# Allegro board 980K2-260817_261120.brd

Outline 419.1 x 474.98 mm; copper layers: TOP, L02_GND, L03_DP, L04_GND, L05_DP, L06_GND, L07_VI, L08_GND, L09_VI, L10_GND, L11_VI, L12_GND, L13_VI, L14_GND, L15_5V, L16_5V, L17_C-BIT, L18_C-BIT, L19_GND, L20_VI, L21_GND, L22_VI, L23_GND, L24_VI, L25_GND, L26_VI, L27_GND, L28_DP, L29_GND, L30_DP, L31_GND, BOTTOM. Coordinates in mm from the lower left corner of the outline.

## Placement (name value [footprint] x y rotation side)
BC9  0.1U-50-X-S4-TDK  [C0402]  86.11 107.82 180 bottom
BR5  1K-1-S4  [R0402]  86.11 106.3 0 bottom
BR6  1K-1-S4  [R0402]  86.11 103.5 0 bottom
BR7  0-5-S6  [R0603]  83.44 106.3 180 bottom
BR8  0-5-S4  [R0402]  86.11 105.03 180 bottom
BR9  0-5-S4  [R0402]  86.11 102.24 180 bottom
BU1  AT24C512C-SSHM-T-SOIC8  [SO8_206X127MM]  91.06 105.66 180 bottom
C48  0.01U-100-X7R-S6-MU  [C0603]  147.57 273.87 90 bottom
C49  0.01U-100-X7R-S6-MU  [C0603]  136.27 268.99 270 bottom
C50  0.01U-100-X7R-S6-MU  [C0603]  142.28 268.54 270 bottom
C53  1U-16-X5R-S4-YA  [C0402]  142.24 261.62 270 bottom
C54  2.2U-16-X-S4-MU  [C0402]  136.53 261.62 270 bottom
C58  1U-16-X5R-S4-YA  [C0402]  142.11 257.68 270 bottom
C59  4.7U-100-X-SB-MU  [C1210]  140.59 246.51 270 bottom
C60  0.01U-100-X7R-S6-MU  [C0603]  147.01 259.72 0 bottom
C61  0.01U-100-X7R-S6-MU  [C0603]  156.88 264.78 180 bottom
C62  2.2U-16-X-S4-MU  [C0402]  157.07 259.72 0 bottom
C63  0.01U-100-X7R-S6-MU  [C0603]  157.73 261.82 90 bottom
C64  0.01U-100-X7R-S6-MU  [C0603]  156.88 267.82 180 bottom
C65  0.1U-25-X7R-S4-MU  [C0402]  157.73 271.37 90 bottom
C66  0.1U-25-X7R-S4-MU  [C0402]  152.65 276.61 180 bottom
C67  0.1U-25-X7R-S4-MU  [C0402]  150.24 278.13 180 bottom
C68  0.1U-25-X7R-S4-MU  [C0402]  147.83 282.7 180 bottom
C69  0.01U-100-X7R-S6-MU  [C0603]  151.96 259.72 0 bottom
C70  0.1U-25-X7R-S4-MU  [C0402]  122.8 294.89 180 bottom
C71  0.1U-25-X7R-S4-MU  [C0402]  129.42 294.89 180 bottom
C72  0.1U-25-X7R-S4-MU  [C0402]  158.75 227.33 0 bottom
C73  0.1U-25-X7R-S4-MU  [C0402]  153.67 227.33 0 bottom
C74  0.1U-25-X7R-S4-MU  [C0402]  157.73 273.91 90 bottom
CT1  47U-16-X5R-SB-MU  [C1210]  88.14 153.16 180 bottom
CT2  10U-16-X5R-S8-TY  [C0805]  108.2 164.59 90 bottom
CT3  22U-16-X-S8-MU  [C0805]  110.49 164.59 90 bottom
CT7  47U-16-X5R-SB-MU  [C1210]  88.14 132.84 180 bottom
CT8  10U-16-X5R-S8-TY  [C0805]  110.49 144.27 90 bottom
CT9  22U-16-X-S8-MU  [C0805]  108.2 144.27 90 bottom
F1  C1F8-0.25A-SA  [FUSE_1206_H1P05MM]  88.14 156.72 0 bottom
F2  C1F8-0.25A-SA  [FUSE_1206_H1P05MM]  88.14 136.4 0 bottom
FD1  -  [FD_040_V2]  95.25 123.19 0 top
FD2  -  [FD_040_V2]  323.85 123.19 0 top
FD3  -  [FD_040_V2]  323.85 351.79 0 top
FD4  -  [FD_040_V2]  95.25 351.79 0 top
FD5  -  [FD_040_V2]  323.85 123.19 180 bottom
FD6  -  [FD_040_V2]  95.25 123.19 180 bottom
FD7  -  [FD_040_V2]  95.25 351.79 180 bottom
FD8  -  [FD_040_V2]  323.85 351.79 180 bottom
FD9  -  [FD_040_V2]  19.05 123.19 0 top
FD10  -  [FD_040_V2]  400.05 123.19 0 top
FD11  -  [FD_040_V2]  400.05 351.79 0 top
FD12  -  [FD_040_V2]  19.05 351.79 0 top
FD13  -  [FD_040_V2]  400.05 123.19 180 bottom
FD14  -  [FD_040_V2]  19.05 123.19 180 bottom
FD15  -  [FD_040_V2]  19.05 351.79 180 bottom
FD16  -  [FD_040_V2]  400.05 351.79 180 bottom
K1  UA2-5NJ-A-V3  [RL_NECUA2_5V_V3]  138.43 290.63 270 bottom
K2  G3VM-201DR  [RL_G3VM201DR_200V]  144.15 277.5 0 bottom
K3  G3VM-201DR  [RL_G3VM201DR_200V]  134.49 273.18 90 bottom
K4  G3VM-201DR  [RL_G3VM201DR_200V]  144.15 291.47 0 bottom
K5  G3VM-51UR-5V-VSON4  [RL_G3VM_4P_VSON4]  139.95 268.99 0 bottom
K6  G3VM-51UR-5V-VSON4  [RL_G3VM_4P_VSON4]  139.95 266.19 0 bottom
K7  G3VM-51UR-5V-VSON4  [RL_G3VM_4P_VSON4]  139.95 264.16 0 bottom
K8  G3VM-51UR-5V-VSON4  [RL_G3VM_4P_VSON4]  139.95 261.62 0 bottom
K9  G3VM-51UR-5V-VSON4  [RL_G3VM_4P_VSON4]  134.24 261.62 0 bottom
K10  G3VM-51UR-5V-VSON4  [RL_G3VM_4P_VSON4]  135.38 264.16 0 bottom
K11  G3VM-51UR-5V-VSON4  [RL_G3VM_4P_VSON4]  143.76 257.3 90 bottom
K12  G3VM-51UR-5V-VSON4  [RL_G3VM_4P_VSON4]  143.76 252.48 90 bottom
K13  G3VM-51UR-5V-VSON4  [RL_G3VM_4P_VSON4]  143.76 246.51 90 bottom
K14  G3VM-51UR-5V-VSON4  [RL_G3VM_4P_VSON4]  146.56 252.48 90 bottom
K15  UA2-5NJ-A-V3  [RL_NECUA2_5V_V3]  135.25 242.75 270 bottom
K16  G3VM-51UR-5V-VSON4  [RL_G3VM_4P_VSON4]  146.56 257.3 90 bottom
K17  G3VM-51UR-5V-VSON4  [RL_G3VM_4P_VSON4]  148.72 257.3 90 bottom
K18  G3VM-51UR-5V-VSON4  [RL_G3VM_4P_VSON4]  148.72 252.48 90 bottom
K19  G3VM-51UR-5V-VSON4  [RL_G3VM_4P_VSON4]  151.51 257.3 90 bottom
K20  G3VM-51UR-5V-VSON4  [RL_G3VM_4P_VSON4]  151.51 252.48 90 bottom
K21  G3VM-51UR-5V-VSON4  [RL_G3VM_4P_VSON4]  153.67 257.3 90 bottom
K22  G3VM-51UR-5V-VSON4  [RL_G3VM_4P_VSON4]  153.67 252.48 90 bottom
K23  UA2-5NJ-A-V3  [RL_NECUA2_5V_V3]  152.78 242.75 270 bottom
K24  UA2-5NJ-A-V3  [RL_NECUA2_5V_V3]  161.04 242.75 270 bottom
K25  G3VM-51UR-5V-VSON4  [RL_G3VM_4P_VSON4]  156.97 257.3 90 bottom
K26  G3VM-51UR-5V-VSON4  [RL_G3VM_4P_VSON4]  156.97 252.48 90 bottom
K27  G3VM-51UR-5V-VSON4  [RL_G3VM_4P_VSON4]  160.15 261.37 180 bottom
K28  G3VM-51UR-5V-VSON4  [RL_G3VM_4P_VSON4]  164.72 261.37 180 bottom
K29  G3VM-51UR-5V-VSON4  [RL_G3VM_4P_VSON4]  169.29 261.37 180 bottom
K30  G3VM-51UR-5V-VSON4  [RL_G3VM_4P_VSON4]  160.15 265.18 180 bottom
K31  G3VM-51UR-5V-VSON4  [RL_G3VM_4P_VSON4]  164.72 265.18 180 bottom
K32  G3VM-51UR-5V-VSON4  [RL_G3VM_4P_VSON4]  169.29 265.18 180 bottom
K33  G3VM-51UR-5V-VSON4  [RL_G3VM_4P_VSON4]  160.15 268.22 180 bottom
K34  G3VM-51UR-5V-VSON4  [RL_G3VM_4P_VSON4]  164.72 268.22 180 bottom
K35  G3VM-51UR-5V-VSON4  [RL_G3VM_4P_VSON4]  169.29 268.22 180 bottom
K36  G3VM-51UR-5V-VSON4  [RL_G3VM_4P_VSON4]  160.15 271.27 180 bottom
K37  G3VM-51UR-5V-VSON4  [RL_G3VM_4P_VSON4]  164.72 271.27 180 bottom
K38  G3VM-51UR-5V-VSON4  [RL_G3VM_4P_VSON4]  160.15 273.81 180 bottom
K39  G3VM-51UR-5V-VSON4  [RL_G3VM_4P_VSON4]  164.72 273.81 180 bottom
K40  G3VM-51UR-5V-VSON4  [RL_G3VM_4P_VSON4]  155.58 273.05 270 bottom
K41  G3VM-51UR-5V-VSON4  [RL_G3VM_4P_VSON4]  155.58 277.62 270 bottom
K42  G3VM-51UR-5V-VSON4  [RL_G3VM_4P_VSON4]  155.58 282.19 270 bottom
K43  G3VM-51UR-5V-VSON4  [RL_G3VM_4P_VSON4]  152.65 273.05 270 bottom
K44  G3VM-51UR-5V-VSON4  [RL_G3VM_4P_VSON4]  152.65 278.89 270 bottom
K45  G3VM-51UR-5V-VSON4  [RL_G3VM_4P_VSON4]  152.65 283.46 270 bottom
K46  G3VM-51UR-5V-VSON4  [RL_G3VM_4P_VSON4]  150.24 274.57 270 bottom
K47  G3VM-51UR-5V-VSON4  [RL_G3VM_4P_VSON4]  150.24 280.42 270 bottom
K48  G3VM-51UR-5V-VSON4  [RL_G3VM_4P_VSON4]  150.24 284.99 270 bottom
K49  G3VM-51UR-5V-VSON4  [RL_G3VM_4P_VSON4]  147.83 284.99 270 bottom
K50  G3VM-51UR-5V-VSON4  [RL_G3VM_4P_VSON4]  147.83 279.15 270 bottom
K51  G3VM-51UR-5V-VSON4  [RL_G3VM_4P_VSON4]  148.72 246.51 270 bottom
K52  G3VM-51UR-5V-VSON4  [RL_G3VM_4P_VSON4]  148.72 241.17 90 bottom
K53  G3VM-51UR-5V-VSON4  [RL_G3VM_4P_VSON4]  156.97 246.51 270 bottom
K54  G3VM-51UR-5V-VSON4  [RL_G3VM_4P_VSON4]  156.97 241.17 90 bottom
K55  G3VM-51UR-5V-VSON4  [RL_G3VM_4P_VSON4]  123.44 292.35 0 bottom
K56  G3VM-201DR  [RL_G3VM201DR_200V]  128.4 288.67 90 bottom
K57  G3VM-51UR-5V-VSON4  [RL_G3VM_4P_VSON4]  158.12 234.57 270 bottom
K58  G3VM-51UR-5V-VSON4  [RL_G3VM_4P_VSON4]  156.08 234.57 270 bottom
K59  G3VM-51UR-5V-VSON4  [RL_G3VM_4P_VSON4]  153.04 234.57 270 bottom
K60  G3VM-51UR-5V-VSON4  [RL_G3VM_4P_VSON4]  151 234.57 270 bottom
K61  G3VM-51UR-5V-VSON4  [RL_G3VM_4P_VSON4]  130.05 292.35 0 bottom
LD1  LDG-2-S6  [LED_0603]  88.91 165.19 0 top
LD3  LDG-2-S6  [LED_0603]  88.91 144.87 0 top
LT1  L10U-16A-S16.5X15.5-PU  [IND_16P5X15P5MM]  98.93 156.59 0 bottom
LT3  L10U-16A-S16.5X15.5-PU  [IND_16P5X15P5MM]  98.93 136.27 0 bottom
M1  PG_LTXDX_F_X1_OUTLINE_TD_V2  [PG_LTXDX_F_X1_OUTLINE_TD_COHU]  209.55 237.49 0 top
NOREF  -  []  273.76 250.88 90 top
NOREF#2  -  []  223.89 185.24 90 top
NOREF#3  -  []  214.43 292.23 0 top
NOREF#4  -  []  93.68 136.27 0 top
NOREF#5  -  []  279.4 262.09 0 top
NOREF#6  -  []  178.83 232.23 0 top
NOREF#7  -  []  232.72 257.6 0 top
NOREF#8  -  []  199.06 238.07 0 top
NOREF#9  -  []  170.89 206.13 0 top
NOREF#10  -  []  148.78 228.49 0 top
NOREF#11  -  []  179.72 213.6 90 top
NOREF#12  -  []  138.56 246.51 0 top
NOREF#13  -  []  149.78 228.3 0 top
NOREF#14  -  []  271.24 193.03 90 top
NOREF#15  -  []  196.52 216.55 0 top
NOREF#16  -  []  187.03 231.4 0 top
NOREF#17  -  []  163.97 214.54 0 top
NOREF#18  -  []  187.8 209.99 0 top
NOREF#19  -  []  175.02 268.14 90 top
NOREF#20  -  []  195.17 272.17 90 top
NOREF#21  -  []  156.02 248.11 90 top
NOREF#22  -  []  231.24 253.03 90 top
NOREF#23  -  []  284.64 181.15 90 top
NOREF#24  -  []  236.79 171.3 0 top
NOREF#25  -  []  133.45 184.35 0 top
NOREF#26  -  []  270.97 190.88 90 top
NOREF#27  -  []  202.85 237.22 0 top
NOREF#28  -  []  163.84 261.77 0 top
NOREF#29  -  []  83.04 144.22 90 top
NOREF#30  -  []  243.84 204.78 90 top
NOREF#31  -  []  279.22 250.88 90 top
NOREF#32  -  []  233.98 238.07 0 top
NOREF#33  -  []  279.27 261.77 0 top
NOREF#34  -  []  273.39 197.85 90 top
NOREF#35  -  []  131.22 234.24 90 top
NOREF#36  -  []  234.33 204.33 90 top
NOREF#37  -  []  94.87 108.59 0 top
NOREF#38  -  []  150.88 228.6 90 top
NOREF#39  -  []  189.72 215.77 0 top
NOREF#40  -  []  244.76 392.33 90 top
NOREF#41  -  []  276.52 276.55 0 top
NOREF#42  -  []  201.75 266.13 0 top
NOREF#43  -  []  184.16 191.6 90 top
NOREF#44  -  []  158.64 173.37 90 top
NOREF#45  -  []  243.84 211.67 0 top
NOREF#46  -  []  189.72 275.77 0 top
NOREF#47  -  []  226.01 184.91 90 top
NOREF#48  -  []  152.25 272.17 0 top
NOREF#49  -  []  134.43 292.23 0 top
NOREF#50  -  []  300.14 320.9 0 top
NOREF#51  -  []  293.02 392.33 90 top
NOREF#52  -  []  259.08 261.22 0 top
NOREF#53  -  []  164.95 272.86 90 top
NOREF#54  -  []  138.95 201.55 0 top
NOREF#55  -  []  276.84 227.33 0 top
NOREF#56  -  []  146.01 190.88 90 top
NOREF#57  -  []  262.81 192.78 0 top
NOREF#58  -  []  190.6 173.69 0 top
NOREF#59  -  []  271.18 239.15 0 top
NOREF#60  -  []  193.6 286.96 0 top
NOREF#61  -  []  243.84 201.77 0 top
NOREF#62  -  []  210.89 202.32 0 top
NOREF#63  -  []  187.3 226.19 0 top
NOREF#64  -  []  162.44 232.28 0 top
NOREF#65  -  []  239.22 255.7 90 top
NOREF#66  -  []  162.2 178.35 0 top
NOREF#67  -  []  199.06 178.07 0 top
NOREF#68  -  []  239.27 213.41 90 top
NOREF#69  -  []  182.87 286.99 0 top
NOREF#70  -  []  129.17 231.95 0 top
NOREF#71  -  []  239.27 265.58 0 top
NOREF#72  -  []  260.43 284.38 90 top
NOREF#73  -  []  198.11 172.1 0 top
NOREF#74  -  []  275.17 272.17 90 top
NOREF#75  -  []  264.16 196.43 90 top
NOREF#76  -  []  156.7 241.72 90 top
NOREF#77  -  []  274.39 276.17 90 top
NOREF#78  -  []  271.11 200.17 90 top
NOREF#79  -  []  236.52 216.55 0 top
NOREF#80  -  []  235.17 276.75 90 top
NOREF#81  -  []  288.54 205.9 0 top
NOREF#82  -  []  192.13 284.66 0 top
NOREF#83  -  []  146.88 289.79 0 top
NOREF#84  -  []  154.63 279.22 90 top
NOREF#85  -  []  227.3 280.35 0 top
NOREF#86  -  []  187.45 209.24 0 top
NOREF#87  -  []  271.18 179.15 0 top
NOREF#88  -  []  159.22 195.7 90 top
NOREF#89  -  []  239.72 223.79 90 top
NOREF#90  -  []  131.05 185.49 90 top
NOREF#91  -  []  279.4 274.54 0 top
NOREF#92  -  []  250.92 231.95 90 top
NOREF#93  -  []  283.84 268.62 0 top
NOREF#94  -  []  279.27 268.62 0 top
NOREF#95  -  []  142.81 197.6 0 top
NOREF#96  -  []  140.59 244.98 90 top
NOREF#97  -  []  260.83 261.22 90 top
NOREF#98  -  []  219.08 261.22 0 top
NOREF#99  -  []  281.75 266.13 0 top
NOREF#100  -  []  156.57 185.63 0 top
NOREF#101  -  []  267.43 218.27 90 top
NOREF#102  -  []  232.13 280.09 0 top
NOREF#103  -  []  228.99 180.62 0 top
NOREF#104  -  []  245.38 226.23 0 top
NOREF#105  -  []  236.1 271.85 90 top
NOREF#106  -  []  199.4 205.9 0 top
NOREF#107  -  []  135.43 276.18 0 top
NOREF#108  -  []  239.72 219.22 90 top
NOREF#109  -  []  159.4 204.45 90 top
NOREF#110  -  []  237.92 250.01 0 top
NOREF#111  -  []  180.83 265.79 90 top
NOREF#112  -  []  132.26 248.4 0 top
NOREF#113  -  []  197.74 166.36 90 top
NOREF#114  -  []  228.32 182.05 0 top
NOREF#115  -  []  156.1 220.99 90 top
NOREF#116  -  []  275.92 190.88 90 top
NOREF#117  -  []  219.08 265.79 0 top
NOREF#118  -  []  184.04 191.93 0 top
NOREF#119  -  []  148.24 392.33 90 top
NOREF#120  -  []  255.11 201.22 90 top
NOREF#121  -  []  212.55 284.49 0 top
NOREF#122  -  []  216.55 254.49 90 top
NOREF#123  -  []  176.26 263.76 90 top
NOREF#124  -  []  279.27 271.67 0 top
NOREF#125  -  []  266.83 256.75 0 top
NOREF#126  -  []  150.77 219.22 90 top
NOREF#127  -  []  243.92 229.94 0 top
NOREF#128  -  []  235.15 176.17 90 top
NOREF#129  -  []  213.36 201.22 0 top
NOREF#130  -  []  288.39 456.29 0 top
NOREF#131  -  []  276.1 276.42 90 top
NOREF#132  -  []  199.27 211.67 0 top
NOREF#133  -  []  279.22 190.88 90 top
NOREF#134  -  []  270.6 173.69 0 top
NOREF#135  -  []  197.71 232.86 0 top
NOREF#136  -  []  185.42 274.72 90 top
NOREF#137  -  []  237.04 244.35 0 top
NOREF#138  -  []  244.95 264.23 90 top
NOREF#139  -  []  199.72 274.65 90 top
NOREF#140  -  []  229.84 273.7 90 top
NOREF#141  -  []  155.58 202.67 90 top
NOREF#142  -  []  161.41 227.9 90 top
NOREF#143  -  []  146.16 258.18 0 top
NOREF#144  -  []  199.27 208.62 0 top
NOREF#145  -  []  234.07 251.6 90 top
NOREF#146  -  []  190.97 195.7 90 top
NOREF#147  -  []  268.78 228.49 0 top
NOREF#148  -  []  152.25 282.59 90 top
NOREF#149  -  []  226.28 257.85 90 top
NOREF#150  -  []  175.65 184.35 0 top
NOREF#151  -  []  131.22 294.24 90 top
NOREF#152  -  []  268.44 253.03 90 top
NOREF#153  -  []  231.11 258.18 0 top
NOREF#154  -  []  168.54 260.64 90 top
NOREF#155  -  []  192.25 212.18 90 top
NOREF#156  -  []  272.13 280.09 0 top
NOREF#157  -  []  191.11 253.35 0 top
NOREF#158  -  []  266.69 297.01 90 top
NOREF#159  -  []  204.64 241.15 90 top
NOREF#160  -  []  158.04 228.3 0 top
NOREF#161  -  []  318.12 17.15 90 top
NOREF#162  -  []  236.54 167 0 top
NOREF#163  -  []  196.8 220.49 90 top
NOREF#164  -  []  227.43 284.11 0 top
NOREF#165  -  []  220.83 268.59 90 top
NOREF#166  -  []  167.95 226.12 90 top
NOREF#167  -  []  151.79 196.75 0 top
NOREF#168  -  []  196.57 245.63 90 top
NOREF#169  -  []  164.64 181.15 90 top
NOREF#170  -  []  193.39 193.03 90 top
NOREF#171  -  []  156.52 216.55 0 top
NOREF#172  -  []  174.07 210.89 90 top
NOREF#173  -  []  204.95 207.27 90 top
NOREF#174  -  []  283.97 265.9 0 top
NOREF#175  -  []  224.04 185.96 0 top
NOREF#176  -  []  140.43 224.38 90 top
NOREF#177  -  []  260.43 224.38 90 top
NOREF#178  -  []  186.7 237.02 90 top
NOREF#179  -  []  269.12 256.43 90 top
NOREF#180  -  []  226.96 191.6 90 top
NOREF#181  -  []  279.27 207.82 90 top
NOREF#182  -  []  192.25 218.02 90 top
NOREF#183  -  []  181.55 262.57 90 top
NOREF#184  -  []  273.27 198.18 0 top
NOREF#185  -  []  189.84 224.11 90 top
NOREF#186  -  []  268.32 193.35 0 top
NOREF#187  -  []  212.87 287.4 90 top
NOREF#188  -  []  271.19 283.92 0 top
NOREF#189  -  []  189.12 256.43 90 top
NOREF#190  -  []  227.05 269.24 0 top
NOREF#191  -  []  191.53 173.37 90 top
NOREF#192  -  []  187.3 286.19 0 top
NOREF#193  -  []  239.27 271.67 0 top
NOREF#194  -  []  284.95 260.42 90 top
NOREF#195  -  []  186.7 283.04 90 top
NOREF#196  -  []  241.12 248.11 90 top
NOREF#197  -  []  183.89 245.24 90 top
NOREF#198  -  []  258.95 204.09 0 top
NOREF#199  -  []  239.44 239.15 0 top
NOREF#200  -  []  297.39 456.29 0 top
NOREF#201  -  []  153.03 232.1 0 top
NOREF#202  -  []  194.33 264.33 90 top
NOREF#203  -  []  266.83 196.75 0 top
NOREF#204  -  []  249.52 210.32 90 top
NOREF#205  -  []  148.32 245.63 0 top
NOREF#206  -  []  151.18 179.15 0 top
NOREF#207  -  []  189.72 281.62 0 top
NOREF#208  -  []  287.25 19.69 90 top
NOREF#209  -  []  289.52 272.86 90 top
NOREF#210  -  []  251.05 185.49 90 top
NOREF#211  -  []  228.32 198.18 0 top
NOREF#212  -  []  236.57 245.63 0 top
NOREF#213  -  []  264.04 185.96 0 top
NOREF#214  -  []  178.97 18.69 0 top
NOREF#215  -  []  152.13 220.09 0 top
NOREF#216  -  []  212.55 250.49 90 top
NOREF#217  -  []  271.91 251.6 90 top
NOREF#218  -  []  193.6 282.39 0 top
NOREF#219  -  []  196.33 167.9 90 top
NOREF#220  -  []  143.89 185.24 90 top
NOREF#221  -  []  181.6 248.12 0 top
NOREF#222  -  []  155.05 274.25 0 top
NOREF#223  -  []  277.71 233.69 90 top
NOREF#224  -  []  158.11 172.1 0 top
NOREF#225  -  []  275.49 18.69 90 top
NOREF#226  -  []  279.4 208.95 0 top
NOREF#227  -  []  156.81 232.54 0 top
NOREF#228  -  []  220.95 261.55 90 top
NOREF#229  -  []  294.09 207.27 90 top
NOREF#230  -  []  138.83 292.23 0 top
NOREF#231  -  []  179.08 205.79 0 top
NOREF#232  -  []  226.16 212.17 90 top
NOREF#233  -  []  211.05 245.49 90 top
NOREF#234  -  []  269.24 185.31 90 top
NOREF#235  -  []  193.95 256.75 0 top
NOREF#236  -  []  171.05 185.49 90 top
NOREF#237  -  []  255.84 202.57 90 top
NOREF#238  -  []  270.97 179.57 90 top
NOREF#239  -  []  276.7 197.85 90 top
NOREF#240  -  []  189.84 273.7 0 top
NOREF#241  -  []  232.63 172.86 0 top
NOREF#242  -  []  248.54 205.9 0 top
NOREF#243  -  []  125.25 291.4 0 top
NOREF#244  -  []  159.24 184.35 0 top
NOREF#245  -  []  192.63 233.69 0 top
NOREF#246  -  []  207.95 286.12 90 top
NOREF#247  -  []  277.74 166.36 90 top
NOREF#248  -  []  138.95 206.12 0 top
NOREF#249  -  []  231.11 253.35 0 top
NOREF#250  -  []  193.27 258.18 0 top
NOREF#251  -  []  144.04 185.96 0 top
NOREF#252  -  []  177.29 247.78 0 top
NOREF#253  -  []  239.4 213.09 90 top
NOREF#254  -  []  193.76 190.88 90 top
NOREF#255  -  []  95.35 396.29 0 top
NOREF#256  -  []  131.84 21.69 90 top
NOREF#257  -  []  232.25 222.59 0 top
NOREF#258  -  []  189.84 284.11 90 top
NOREF#259  -  []  239.72 214.65 90 top
NOREF#260  -  []  161.44 184.35 0 top
NOREF#261  -  []  196.52 221.12 0 top
NOREF#262  -  []  166.32 269.17 0 top
NOREF#263  -  []  152.11 231.4 0 top
NOREF#264  -  []  243.84 260.97 90 top
NOREF#265  -  []  239.4 262.09 0 top
NOREF#266  -  []  179.72 273.6 90 top
NOREF#267  -  []  109.54 14.59 90 top
NOREF#268  -  []  151.7 277.85 0 top
NOREF#269  -  []  195.17 216.75 0 top
NOREF#270  -  []  196.52 285.69 0 top
NOREF#271  -  []  129.17 291.95 0 top
NOREF#272  -  []  246.32 206.13 0 top
NOREF#273  -  []  136.5 271.94 90 top
NOREF#274  -  []  243.84 271.67 0 top
NOREF#275  -  []  196.57 182.05 0 top
NOREF#276  -  []  270.56 197.6 0 top
NOREF#277  -  []  192.63 233.69 90 top
NOREF#278  -  []  260.95 266.12 90 top
NOREF#279  -  []  283.84 205.58 0 top
NOREF#280  -  []  156.38 241.15 90 top
NOREF#281  -  []  249.52 272.86 90 top
NOREF#282  -  []  230.77 213.37 90 top
NOREF#283  -  []  214.04 210.63 90 top
NOREF#284  -  []  277.25 256.75 0 top
NOREF#285  -  []  130.02 274.45 0 top
NOREF#286  -  []  211.25 244.35 0 top
NOREF#287  -  []  197.92 190.01 0 top
NOREF#288  -  []  159.27 268.62 0 top
NOREF#289  -  []  226.96 251.6 90 top
NOREF#290  -  []  180.59 184.98 90 top
NOREF#291  -  []  275.17 216.75 0 top
NOREF#292  -  []  281.75 209.17 0 top
NOREF#293  -  []  271.73 172.54 0 top
NOREF#294  -  []  193.6 216.55 0 top
NOREF#295  -  []  266.01 190.88 90 top
NOREF#296  -  []  237.59 175.77 0 top
NOREF#297  -  []  197.04 244.35 0 top
NOREF#298  -  []  250.89 266.13 0 top
NOREF#299  -  []  172.87 227.4 90 top
NOREF#300  -  []  190.77 223.79 90 top
NOREF#301  -  []  288.54 260.64 90 top
NOREF#302  -  []  164.95 204.23 90 top
NOREF#303  -  []  266.96 196.43 90 top
NOREF#304  -  []  128.94 221.73 0 top
NOREF#305  -  []  324.88 21.69 90 top
NOREF#306  -  []  235.96 228.6 90 top
NOREF#307  -  []  236.38 241.15 90 top
NOREF#308  -  []  153.39 193.03 90 top
NOREF#309  -  []  228.32 258.18 0 top
NOREF#310  -  []  207.98 226.38 90 top
NOREF#311  -  []  268.32 253.35 0 top
NOREF#312  -  []  248.42 200.97 90 top
NOREF#313  -  []  154.63 282.42 0 top
NOREF#314  -  []  245.04 293.3 90 top
NOREF#315  -  []  283.97 260.64 90 top
NOREF#316  -  []  152.46 247.68 90 top
NOREF#317  -  []  153.95 191.93 0 top
NOREF#318  -  []  197.92 250.01 0 top
NOREF#319  -  []  227.77 257.6 0 top
NOREF#320  -  []  210.89 209.17 0 top
NOREF#321  -  []  157.59 235.77 0 top
NOREF#322  -  []  131.22 294.89 90 top
NOREF#323  -  []  151.71 231.3 0 top
NOREF#324  -  []  268.19 187.71 0 top
NOREF#325  -  []  281.75 274.76 0 top
NOREF#326  -  []  239.72 274.65 90 top
NOREF#327  -  []  199.4 200.64 90 top
NOREF#328  -  []  273.94 191.93 0 top
NOREF#329  -  []  163.97 213.09 90 top
NOREF#330  -  []  130.58 263.21 0 top
NOREF#331  -  []  168.54 267.5 90 top
NOREF#332  -  []  258.95 268.91 0 top
NOREF#333  -  []  133.68 389.27 90 top
NOREF#334  -  []  237.25 251.93 0 top
NOREF#335  -  []  276.81 232.54 0 top
NOREF#336  -  []  241.84 295.2 0 top
NOREF#337  -  []  248.54 268.95 0 top
NOREF#338  -  []  230.77 279.22 90 top
NOREF#339  -  []  151.24 257.85 90 top
NOREF#340  -  []  168.42 208.62 0 top
NOREF#341  -  []  187.8 269.99 0 top
NOREF#342  -  []  238.64 233.37 90 top
NOREF#343  -  []  159.22 179.57 90 top
NOREF#344  -  []  309.55 14.59 90 top
NOREF#345  -  []  269.84 273.7 90 top
NOREF#346  -  []  174.38 204.09 0 top
NOREF#347  -  []  146.7 223.05 90 top
NOREF#348  -  []  244.32 231.95 90 top
NOREF#349  -  []  195.68 233.69 90 top
NOREF#350  -  []  163.97 265.9 0 top
NOREF#351  -  []  275.17 216.75 90 top
NOREF#352  -  []  275.58 262.67 90 top
NOREF#353  -  []  187.03 171.4 0 top
NOREF#354  -  []  196.02 241.47 0 top
NOREF#355  -  []  208.54 260.64 90 top
NOREF#356  -  []  163.84 200.97 90 top
NOREF#357  -  []  124.61 234.89 90 top
NOREF#358  -  []  231.95 178.07 0 top
NOREF#359  -  []  188.81 195.7 90 top
NOREF#360  -  []  220.83 201.22 90 top
NOREF#361  -  []  155.15 176.17 90 top
NOREF#362  -  []  155.78 237.5 90 top
NOREF#363  -  []  156.54 167 0 top
NOREF#364  -  []  157.37 191.6 90 top
NOREF#365  -  []  278.64 173.37 90 top
NOREF#366  -  []  185.41 213.02 90 top
NOREF#367  -  []  248.42 264.78 90 top
NOREF#368  -  []  197.25 191.93 0 top
NOREF#369  -  []  199.22 190.88 90 top
NOREF#370  -  []  271.19 223.92 0 top
NOREF#371  -  []  271.46 227 0 top
NOREF#372  -  []  258.35 207.01 0 top
NOREF#373  -  []  153.18 282.26 90 top
NOREF#374  -  []  254.07 210.89 90 top
NOREF#375  -  []  91.03 148.19 0 top
NOREF#376  -  []  211.14 458.49 0 top
NOREF#377  -  []  192.72 257.6 0 top
NOREF#378  -  []  237.25 180.62 0 top
NOREF#379  -  []  217.29 187.78 0 top
NOREF#380  -  []  226.16 260.17 90 top
NOREF#381  -  []  262.81 197.6 0 top
NOREF#382  -  []  168.54 262.09 0 top
NOREF#383  -  []  179.08 261.22 0 top
NOREF#384  -  []  236.8 220.49 90 top
NOREF#385  -  []  154.07 191.6 90 top
NOREF#386  -  []  262.87 273.02 0 top
NOREF#387  -  []  245.38 226.23 0 top
NOREF#388  -  []  229.12 196.43 90 top
NOREF#389  -  []  220.83 203.76 90 top
NOREF#390  -  []  150.77 283.79 90 top
NOREF#391  -  []  148.95 206.89 0 top
NOREF#392  -  []  159.65 212.56 0 top
NOREF#393  -  []  189.84 219.54 90 top
NOREF#394  -  []  248.94 281.73 0 top
NOREF#395  -  []  253.65 179.15 0 top
NOREF#396  -  []  273.56 233.37 90 top
NOREF#397  -  []  234.07 256.43 90 top
NOREF#398  -  []  196.02 192.78 0 top
NOREF#399  -  []  266.01 195.7 90 top
NOREF#400  -  []  229.12 191.6 90 top
NOREF#401  -  []  187.77 252.78 0 top
NOREF#402  -  []  211.05 185.49 90 top
NOREF#403  -  []  86.61 153.16 0 top
NOREF#404  -  []  192.72 192.78 0 top
NOREF#405  -  []  191.24 197.85 90 top
NOREF#406  -  []  193.18 244.35 0 top
NOREF#407  -  []  250.89 209.17 0 top
NOREF#408  -  []  190.97 179.57 90 top
NOREF#409  -  []  199.4 264.45 90 top
NOREF#410  -  []  248.42 267.82 90 top
NOREF#411  -  []  163.4 296.38 0 top
NOREF#412  -  []  159.72 214.65 90 top
NOREF#413  -  []  181.85 246.47 0 top
NOREF#414  -  []  199.27 271.67 0 top
NOREF#415  -  []  209.52 267.27 90 top
NOREF#416  -  []  187.77 192.78 0 top
NOREF#417  -  []  243.97 210.55 90 top
NOREF#418  -  []  189.12 180.3 90 top
NOREF#419  -  []  193.95 191.93 0 top
NOREF#420  -  []  199.24 184.35 0 top
NOREF#421  -  []  242.44 292.28 0 top
NOREF#422  -  []  146.17 272.17 90 top
NOREF#423  -  []  169.17 231.95 0 top
NOREF#424  -  []  178.95 266.12 0 top
NOREF#425  -  []  202.26 176.17 90 top
NOREF#426  -  []  269.86 17.15 0 top
NOREF#427  -  []  276.7 181.72 90 top
NOREF#428  -  []  199.24 244.35 0 top
NOREF#429  -  []  153.98 238.07 0 top
NOREF#430  -  []  237.71 172.86 0 top
NOREF#431  -  []  206.32 209.17 0 top
NOREF#432  -  []  253.62 289.09 90 top
NOREF#433  -  []  203.84 211.67 0 top
NOREF#434  -  []  216.55 194.49 90 top
NOREF#435  -  []  147.43 218.27 90 top
NOREF#436  -  []  215.02 208.14 90 top
NOREF#437  -  []  187.8 265.39 90 top
NOREF#438  -  []  176.38 204.09 90 top
NOREF#439  -  []  155.05 278.82 0 top
NOREF#440  -  []  276.57 185.63 0 top
NOREF#441  -  []  187.99 178.35 0 top
NOREF#442  -  []  159.27 210.87 90 top
NOREF#443  -  []  159.22 190.88 90 top
NOREF#444  -  []  268.81 190.88 90 top
NOREF#445  -  []  148.32 185.63 0 top
NOREF#446  -  []  133.36 201.22 0 top
NOREF#447  -  []  162.85 297.22 0 top
NOREF#448  -  []  269.84 284.11 90 top
NOREF#449  -  []  80.49 155.57 0 top
NOREF#450  -  []  157.71 173.69 0 top
NOREF#451  -  []  234.39 276.17 90 top
NOREF#452  -  []  137.28 286.47 0 top
NOREF#453  -  []  155.68 233.69 90 top
NOREF#454  -  []  196.8 274.65 90 top
NOREF#455  -  []  187.43 278.27 0 top
NOREF#456  -  []  272.72 197.6 0 top
NOREF#457  -  []  275.56 235.77 0 top
NOREF#458  -  []  237.37 180.3 90 top
NOREF#459  -  []  248.42 260.97 90 top
NOREF#460  -  []  240.11 18.69 0 top
NOREF#461  -  []  276.8 214.65 90 top
NOREF#462  -  []  209.55 237.49 0 top
NOREF#463  -  []  156.8 225.06 90 top
NOREF#464  -  []  152.13 274.25 0 top
NOREF#465  -  []  154.63 277.85 0 top
NOREF#466  -  []  270.97 239.57 90 top
NOREF#467  -  []  279.27 265.58 0 top
NOREF#468  -  []  155.96 228.6 90 top
NOREF#469  -  []  273.27 193.35 0 top
NOREF#470  -  []  236.02 252.78 0 top
NOREF#471  -  []  174.43 292.23 0 top
NOREF#472  -  []  236.57 198.18 0 top
NOREF#473  -  []  266.43 296.46 90 top
NOREF#474  -  []  191.73 232.54 0 top
NOREF#475  -  []  263.36 247.38 0 top
NOREF#476  -  []  152.25 222.59 90 top
NOREF#477  -  []  188.35 283.79 90 top
NOREF#478  -  []  228.32 242.05 0 top
NOREF#479  -  []  89.74 155.92 0 top
NOREF#480  -  []  145.61 252.5 0 top
NOREF#481  -  []  246.32 214.76 0 top
NOREF#482  -  []  159.27 265.58 0 top
NOREF#483  -  []  133.78 207.01 0 top
NOREF#484  -  []  181.55 209.94 90 top
NOREF#485  -  []  150.97 179.57 90 top
NOREF#486  -  []  273.18 244.35 0 top
NOREF#487  -  []  187.77 257.6 0 top
NOREF#488  -  []  230.56 192.78 0 top
NOREF#489  -  []  265.61 252.78 0 top
NOREF#490  -  []  170.89 202.32 0 top
NOREF#491  -  []  283.97 212 0 top
NOREF#492  -  []  200.23 176.17 90 top
NOREF#493  -  []  196.79 231.3 0 top
NOREF#494  -  []  288.54 267.5 90 top
NOREF#495  -  []  183.36 198.18 0 top
NOREF#496  -  []  186.83 196.75 0 top
NOREF#497  -  []  148.32 258.18 0 top
NOREF#498  -  []  255.84 262.57 90 top
NOREF#499  -  []  283.97 268.95 0 top
NOREF#500  -  []  187.77 197.6 0 top
NOREF#501  -  []  157.37 251.6 90 top
NOREF#502  -  []  139.55 294.49 0 top
NOREF#503  -  []  211.21 234.89 90 top
NOREF#504  -  []  237.74 166.36 90 top
NOREF#505  -  []  279.4 204.45 90 top
NOREF#506  -  []  199.27 264.78 90 top
NOREF#507  -  []  239.4 200.64 90 top
NOREF#508  -  []  163.97 202.09 0 top
NOREF#509  -  []  141.85 246.47 0 top
NOREF#510  -  []  168.54 204.45 90 top
NOREF#511  -  []  286.32 206.13 0 top
NOREF#512  -  []  225.41 286.99 90 top
NOREF#513  -  []  157.81 389.27 90 top
NOREF#514  -  []  214.09 204.23 90 top
NOREF#515  -  []  232.25 282.59 0 top
NOREF#516  -  []  180.95 206.12 90 top
NOREF#517  -  []  199.4 274.54 0 top
NOREF#518  -  []  288.42 260.97 90 top
NOREF#519  -  []  199.4 273.09 90 top
NOREF#520  -  []  157.37 196.43 90 top
NOREF#521  -  []  189.84 213.7 90 top
NOREF#522  -  []  197.71 173.69 0 top
NOREF#523  -  []  186.16 193.35 0 top
NOREF#524  -  []  236.7 253.03 90 top
NOREF#525  -  []  151.98 226.59 90 top
NOREF#526  -  []  195.68 233.69 0 top
NOREF#527  -  []  188.81 190.88 90 top
NOREF#528  -  []  208.54 207.5 90 top
NOREF#529  -  []  251.05 229.49 0 top
NOREF#530  -  []  175.84 202.57 90 top
NOREF#531  -  []  186.96 251.6 90 top
NOREF#532  -  []  227.43 224.11 90 top
NOREF#533  -  []  223.36 193.35 0 top
NOREF#534  -  []  174.04 270.63 90 top
NOREF#535  -  []  281.75 212.22 0 top
NOREF#536  -  []  135.02 208.14 90 top
NOREF#537  -  []  241.75 214.76 0 top
NOREF#538  -  []  196.1 216.42 90 top
NOREF#539  -  []  235.17 281.32 0 top
NOREF#540  -  []  276.8 220.49 90 top
NOREF#541  -  []  149.29 279.37 0 top
NOREF#542  -  []  271.76 167.33 0 top
NOREF#543  -  []  223.89 245.24 90 top
NOREF#544  -  []  143.36 187.38 0 top
NOREF#545  -  []  193.76 195.7 90 top
NOREF#546  -  []  122.44 232.28 0 top
NOREF#547  -  []  266.16 253.35 0 top
NOREF#548  -  []  174.07 270.89 90 top
NOREF#549  -  []  129.44 260.67 0 top
NOREF#550  -  []  243.84 213.41 90 top
NOREF#551  -  []  232.13 274.25 0 top
NOREF#552  -  []  260.95 201.55 90 top
NOREF#553  -  []  152.63 173.69 90 top
NOREF#554  -  []  152.72 192.78 0 top
NOREF#555  -  []  227.77 252.78 0 top
NOREF#556  -  []  192.72 197.6 0 top
NOREF#557  -  []  272.72 252.78 0 top
NOREF#558  -  []  134.04 210.63 90 top
NOREF#559  -  []  213.65 239.15 0 top
NOREF#560  -  []  273.39 253.03 90 top
NOREF#561  -  []  271.19 278.07 0 top
NOREF#562  -  []  203.4 296.38 0 top
NOREF#563  -  []  271.79 196.75 0 top
NOREF#564  -  []  168.54 265.9 0 top
NOREF#565  -  []  191.79 251.93 0 top
NOREF#566  -  []  239.27 201.77 0 top
NOREF#567  -  []  250.92 291.95 90 top
NOREF#568  -  []  158.91 232.21 90 top
NOREF#569  -  []  233.27 198.18 0 top
NOREF#570  -  []  277.18 236.17 90 top
NOREF#571  -  []  214.43 232.23 0 top
NOREF#572  -  []  274.39 222.02 90 top
NOREF#573  -  []  242.85 297.22 0 top
NOREF#574  -  []  214.38 204.09 0 top
NOREF#575  -  []  272.51 175.77 0 top
NOREF#576  -  []  265.41 273.02 90 top
NOREF#577  -  []  151.7 283.69 0 top
NOREF#578  -  []  147.77 197.6 0 top
NOREF#579  -  []  267.99 238.35 0 top
NOREF#580  -  []  271.19 228.49 0 top
NOREF#581  -  []  202.44 232.28 0 top
NOREF#582  -  []  279.27 208.62 0 top
NOREF#583  -  []  266.16 198.18 0 top
NOREF#584  -  []  271.95 238.07 0 top
NOREF#585  -  []  221.03 267.69 90 top
NOREF#586  -  []  152.13 280.09 0 top
NOREF#587  -  []  173.65 179.15 0 top
NOREF#588  -  []  265.09 257.49 90 top
NOREF#589  -  []  205.38 226.23 0 top
NOREF#590  -  []  131.05 289.49 0 top
NOREF#591  -  []  156.52 225.69 0 top
NOREF#592  -  []  258.97 211.91 90 top
NOREF#593  -  []  208.54 268.95 0 top
NOREF#594  -  []  259.4 458.49 0 top
NOREF#595  -  []  139.49 266.31 90 top
NOREF#596  -  []  260.95 268.91 90 top
NOREF#597  -  []  235.17 216.75 0 top
NOREF#598  -  []  275.68 233.69 90 top
NOREF#599  -  []  89.74 155.92 90 top
NOREF#600  -  []  182.03 289.03 90 top
NOREF#601  -  []  179.73 178.35 0 top
NOREF#602  -  []  197.25 240.62 0 top
NOREF#603  -  []  192.72 252.78 0 top
NOREF#604  -  []  169.52 212.86 90 top
NOREF#605  -  []  199.27 213.41 90 top
NOREF#606  -  []  214.43 292.23 0 top
NOREF#607  -  []  254.04 270.63 90 top
NOREF#608  -  []  186.43 282.49 90 top
NOREF#609  -  []  148.95 266.89 0 top
NOREF#610  -  []  203.4 236.38 0 top
NOREF#611  -  []  175.24 261.55 90 top
NOREF#612  -  []  236.1 216.42 90 top
NOREF#613  -  []  95.35 456.29 90 top
NOREF#614  -  []  263.49 253.03 90 top
NOREF#615  -  []  268.99 251.93 0 top
NOREF#616  -  []  264.26 456.29 0 top
NOREF#617  -  []  267.43 218.27 0 top
NOREF#618  -  []  241.75 206.13 0 top
NOREF#619  -  []  233.6 216.55 0 top
NOREF#620  -  []  209.55 237.49 0 top
NOREF#621  -  []  149.29 286.59 90 top
NOREF#622  -  []  204.95 210.32 90 top
NOREF#623  -  []  259.08 263.76 0 top
NOREF#624  -  []  156.79 231.3 0 top
NOREF#625  -  []  269.55 188.99 90 top
NOREF#626  -  []  312.52 396.29 0 top
NOREF#627  -  []  148.44 193.03 90 top
NOREF#628  -  []  146.96 251.6 90 top
NOREF#629  -  []  156.7 181.72 90 top
NOREF#630  -  []  154.33 267.37 90 top
NOREF#631  -  []  161.75 202.32 0 top
NOREF#632  -  []  288.54 207.5 90 top
NOREF#633  -  []  228.78 244.35 0 top
NOREF#634  -  []  258.35 209.04 0 top
NOREF#635  -  []  156.7 197.85 90 top
NOREF#636  -  []  223.36 258.18 0 top
NOREF#637  -  []  135.15 268.04 90 top
NOREF#638  -  []  169.52 267.27 90 top
NOREF#639  -  []  195.92 195.7 90 top
NOREF#640  -  []  215.02 268.14 90 top
NOREF#641  -  []  167.04 299.09 0 top
NOREF#642  -  []  233.94 256.75 0 top
NOREF#643  -  []  167.95 286.12 90 top
NOREF#644  -  []  233.94 251.93 0 top
NOREF#645  -  []  264.24 18.69 0 top
NOREF#646  -  []  229.84 224.11 0 top
NOREF#647  -  []  182.87 273.02 0 top
NOREF#648  -  []  157.92 252.5 90 top
NOREF#649  -  []  209.55 237.49 0 top
NOREF#650  -  []  216.83 227.03 0 top
NOREF#651  -  []  279.27 201.77 0 top
NOREF#652  -  []  232.25 218.02 90 top
NOREF#653  -  []  231.11 200.17 90 top
NOREF#654  -  []  232.11 171.4 0 top
NOREF#655  -  []  284.64 241.15 90 top
NOREF#656  -  []  254.38 264.09 0 top
NOREF#657  -  []  163.84 265.58 0 top
NOREF#658  -  []  124.61 294.24 90 top
NOREF#659  -  []  157.25 251.93 0 top
NOREF#660  -  []  268.78 184.35 0 top
NOREF#661  -  []  271.95 178.07 0 top
NOREF#662  -  []  272.72 192.78 0 top
NOREF#663  -  []  215.65 244.35 0 top
NOREF#664  -  []  262.03 229.03 90 top
NOREF#665  -  []  189.84 279.54 90 top
NOREF#666  -  []  219.08 201.22 0 top
NOREF#667  -  []  178.95 204.09 0 top
NOREF#668  -  []  268.81 250.88 90 top
NOREF#669  -  []  251.25 244.35 0 top
NOREF#670  -  []  122.85 281.02 0 top
NOREF#671  -  []  149.84 224.11 90 top
NOREF#672  -  []  228.35 277.95 90 top
NOREF#673  -  []  226.7 223.05 90 top
NOREF#674  -  []  201.44 184.35 0 top
NOREF#675  -  []  159.4 208.95 0 top
NOREF#676  -  []  135.15 260.67 0 top
NOREF#677  -  []  202.57 291.95 0 top
NOREF#678  -  []  131.26 244.35 0 top
NOREF#679  -  []  228.78 228.49 0 top
NOREF#680  -  []  156.1 276.42 90 top
NOREF#681  -  []  142.03 229.03 90 top
NOREF#682  -  []  150.97 190.88 90 top
NOREF#683  -  []  159.72 223.79 90 top
NOREF#684  -  []  192.13 220.09 0 top
NOREF#685  -  []  186.16 212.17 90 top
NOREF#686  -  []  141.55 209.94 90 top
NOREF#687  -  []  273.18 277.69 90 top
NOREF#688  -  []  195.96 228.6 90 top
NOREF#689  -  []  159.4 268.95 0 top
NOREF#690  -  []  220.95 206.12 90 top
NOREF#691  -  []  191.71 171.3 0 top
NOREF#692  -  []  147.77 181.47 0 top
NOREF#693  -  []  233.18 222.26 90 top
NOREF#694  -  []  239.06 238.07 0 top
NOREF#695  -  []  277.03 178.07 0 top
NOREF#696  -  []  239.27 273.41 90 top
NOREF#697  -  []  199.65 212.56 0 top
NOREF#698  -  []  237.25 240.62 0 top
NOREF#699  -  []  196.8 285.06 90 top
NOREF#700  -  []  149.84 273.7 90 top
NOREF#701  -  []  163.84 260.97 90 top
NOREF#702  -  []  243.97 208.95 0 top
NOREF#703  -  []  275.92 195.7 90 top
NOREF#704  -  []  272.13 214.25 0 top
NOREF#705  -  []  283.97 264.45 90 top
NOREF#706  -  []  150.15 266.89 90 top
NOREF#707  -  []  90.49 457.2 0 top
NOREF#708  -  []  163.84 264.78 90 top
NOREF#709  -  []  267.77 257.6 0 top
NOREF#710  -  []  219.72 273.6 90 top
NOREF#711  -  []  203.97 205.9 0 top
NOREF#712  -  []  241.75 262.32 0 top
NOREF#713  -  []  173.62 289.09 90 top
NOREF#714  -  []  209.52 270.32 90 top
NOREF#715  -  []  135.43 276.18 0 top
NOREF#716  -  []  248.42 265.58 0 top
NOREF#717  -  []  190.48 175.77 0 top
NOREF#718  -  []  146.17 212.17 90 top
NOREF#719  -  []  258.85 181.15 90 top
NOREF#720  -  []  218.95 201.55 0 top
NOREF#721  -  []  233.18 244.35 0 top
NOREF#722  -  []  231.11 193.35 0 top
NOREF#723  -  []  153.6 226.96 0 top
NOREF#724  -  []  275.17 272.17 0 top
NOREF#725  -  []  169.52 207.27 90 top
NOREF#726  -  []  279.4 268.95 0 top
NOREF#727  -  []  238.11 232.1 0 top
NOREF#728  -  []  93.68 156.59 0 top
NOREF#729  -  []  279.27 273.41 90 top
NOREF#730  -  []  249.52 204.23 90 top
NOREF#731  -  []  159.4 200.64 90 top
NOREF#732  -  []  235.05 278.82 0 top
NOREF#733  -  []  276.54 227 0 top
NOREF#734  -  []  321.52 456.29 0 top
NOREF#735  -  []  181.85 232.5 0 top
NOREF#736  -  []  283.84 270.87 90 top
NOREF#737  -  []  139.72 273.6 90 top
NOREF#738  -  []  163.84 204.78 90 top
NOREF#739  -  []  146.16 193.35 0 top
NOREF#740  -  []  288.42 267.82 90 top
NOREF#741  -  []  188.32 185.63 0 top
NOREF#742  -  []  139.08 208.59 0 top
NOREF#743  -  []  145.42 273.02 90 top
NOREF#744  -  []  176.98 205.11 90 top
NOREF#745  -  []  236.7 257.85 90 top
NOREF#746  -  []  194.07 196.43 90 top
NOREF#747  -  []  208.94 281.73 0 top
NOREF#748  -  []  186.83 191.93 0 top
NOREF#749  -  []  283.97 213.09 90 top
NOREF#750  -  []  143.61 456.29 0 top
NOREF#751  -  []  146.16 200.17 90 top
NOREF#752  -  []  275.92 255.7 90 top
NOREF#753  -  []  196.61 233.37 90 top
NOREF#754  -  []  233.98 178.07 0 top
NOREF#755  -  []  192.87 248.11 90 top
NOREF#756  -  []  208.45 235.2 0 top
NOREF#757  -  []  286.32 274.76 0 top
NOREF#758  -  []  187.05 209.24 0 top
NOREF#759  -  []  159.4 270.55 90 top
NOREF#760  -  []  136.38 264.09 90 top
NOREF#761  -  []  272.25 222.59 90 top
NOREF#762  -  []  178.35 207.01 0 top
NOREF#763  -  []  186.83 251.93 0 top
NOREF#764  -  []  156.84 167.33 0 top
NOREF#765  -  []  210.89 206.13 0 top
NOREF#766  -  []  149.68 334.65 0 top
NOREF#767  -  []  176.55 280.49 0 top
NOREF#768  -  []  220.59 244.98 90 top
NOREF#769  -  []  147.9 265.84 90 top
NOREF#770  -  []  244.64 181.15 90 top
NOREF#771  -  []  196.84 167.33 0 top
NOREF#772  -  []  193.83 232.21 90 top
NOREF#773  -  []  266.16 260.17 90 top
NOREF#774  -  []  286.32 214.76 0 top
NOREF#775  -  []  89.74 135.6 0 top
NOREF#776  -  []  192.13 224.66 0 top
NOREF#777  -  []  159.24 244.35 0 top
NOREF#778  -  []  196.7 197.85 90 top
NOREF#779  -  []  149.84 213.7 0 top
NOREF#780  -  []  168.54 207.5 90 top
NOREF#781  -  []  149.29 282.02 90 top
NOREF#782  -  []  250.89 206.13 0 top
NOREF#783  -  []  187.05 269.24 0 top
NOREF#784  -  []  236.45 247.71 0 top
NOREF#785  -  []  197.37 180.3 90 top
NOREF#786  -  []  235.92 250.88 90 top
NOREF#787  -  []  182.87 213.02 0 top
NOREF#788  -  []  209.55 237.49 0 top
NOREF#789  -  []  243.04 176.5 90 top
NOREF#790  -  []  148.99 240.62 0 top
NOREF#791  -  []  152.72 247.68 0 top
NOREF#792  -  []  142.03 289.03 90 top
NOREF#793  -  []  189.12 191.6 90 top
NOREF#794  -  []  215.11 201.22 90 top
NOREF#795  -  []  152.13 214.25 0 top
NOREF#796  -  []  178.35 204.47 0 top
NOREF#797  -  []  283.97 272 0 top
NOREF#798  -  []  236.8 274.65 90 top
NOREF#799  -  []  191.91 196.43 90 top
NOREF#800  -  []  233.83 232.21 90 top
NOREF#801  -  []  186.7 297.01 90 top
NOREF#802  -  []  231.79 191.93 0 top
NOREF#803  -  []  266.96 191.6 90 top
NOREF#804  -  []  211.25 184.35 0 top
NOREF#805  -  []  264.04 256.75 0 top
NOREF#806  -  []  269.84 213.7 0 top
NOREF#807  -  []  197.37 191.6 90 top
NOREF#808  -  []  154.07 256.43 90 top
NOREF#809  -  []  151.76 227.33 0 top
NOREF#810  -  []  182.81 192.78 0 top
NOREF#811  -  []  238.11 172.1 0 top
NOREF#812  -  []  123.92 229.94 0 top
NOREF#813  -  []  169.52 260.42 90 top
NOREF#814  -  []  221.55 207.14 90 top
NOREF#815  -  []  190.97 239.57 90 top
NOREF#816  -  []  139.73 178.35 0 top
NOREF#817  -  []  272.25 272.17 0 top
NOREF#818  -  []  162.26 236.17 90 top
NOREF#819  -  []  235.68 173.69 0 top
NOREF#820  -  []  155.96 168.6 90 top
NOREF#821  -  []  277.04 184.35 0 top
NOREF#822  -  []  187.43 284.11 0 top
NOREF#823  -  []  193.27 193.35 0 top
NOREF#824  -  []  193.18 222.26 90 top
NOREF#825  -  []  243.97 202.09 0 top
NOREF#826  -  []  188.44 193.03 90 top
NOREF#827  -  []  188.44 241.72 90 top
NOREF#828  -  []  223.49 187.06 90 top
NOREF#829  -  []  268.44 241.72 90 top
NOREF#830  -  []  224.16 251.6 90 top
NOREF#831  -  []  156.57 185.63 90 top
NOREF#832  -  []  261.85 306.46 0 top
NOREF#833  -  []  272.25 282.59 0 top
NOREF#834  -  []  204.95 260.42 90 top
NOREF#835  -  []  144.04 256.75 0 top
NOREF#836  -  []  229.72 221.62 0 top
NOREF#837  -  []  195.17 212.18 0 top
NOREF#838  -  []  205.04 233.3 90 top
NOREF#839  -  []  265.42 214.72 90 top
NOREF#840  -  []  132.87 227.4 90 top
NOREF#841  -  []  243.97 273.09 90 top
NOREF#842  -  []  173.78 207.01 0 top
NOREF#843  -  []  239.4 270.55 90 top
NOREF#844  -  []  142.81 186.81 0 top
NOREF#845  -  []  186.96 196.43 90 top
NOREF#846  -  []  262.87 213.02 0 top
NOREF#847  -  []  162.87 16.49 0 top
NOREF#848  -  []  151.24 197.85 90 top
NOREF#849  -  []  272.25 278.02 90 top
NOREF#850  -  []  198.11 232.1 0 top
NOREF#851  -  []  274.39 282.02 90 top
NOREF#852  -  []  190.73 19.69 90 top
NOREF#853  -  []  232.63 232.86 0 top
NOREF#854  -  []  163.97 268.95 0 top
NOREF#855  -  []  283.97 267.5 90 top
NOREF#856  -  []  233.39 193.03 90 top
NOREF#857  -  []  219.73 238.35 0 top
NOREF#858  -  []  140.83 261.22 90 top
NOREF#859  -  []  270.15 206.89 90 top
NOREF#860  -  []  157.03 238.07 0 top
NOREF#861  -  []  199.72 223.79 90 top
NOREF#862  -  []  174.43 292.23 0 top
NOREF#863  -  []  206.32 202.32 0 top
NOREF#864  -  []  157.04 244.35 0 top
NOREF#865  -  []  155.05 214.25 0 top
NOREF#866  -  []  294.09 204.23 90 top
NOREF#867  -  []  271.11 193.35 0 top
NOREF#868  -  []  227.77 181.47 0 top
NOREF#869  -  []  274.78 236.5 90 top
NOREF#870  -  []  239.4 208.95 0 top
NOREF#871  -  []  104.35 456.29 0 top
NOREF#872  -  []  191.18 239.15 0 top
NOREF#873  -  []  268.89 392.33 90 top
NOREF#874  -  []  203.84 213.41 90 top
NOREF#875  -  []  180.95 266.12 90 top
NOREF#876  -  []  163.97 204.45 90 top
NOREF#877  -  []  148.99 251.93 0 top
NOREF#878  -  []  156.02 247.68 0 top
NOREF#879  -  []  221.03 207.69 90 top
NOREF#880  -  []  270.88 168.6 90 top
NOREF#881  -  []  237.74 226.35 90 top
NOREF#882  -  []  281.41 227.9 90 top
NOREF#883  -  []  149.72 215.77 0 top
NOREF#884  -  []  214.09 267.27 90 top
NOREF#885  -  []  229.67 190.01 0 top
NOREF#886  -  []  228.32 253.35 0 top
NOREF#887  -  []  153.18 244.35 0 top
NOREF#888  -  []  149.29 289.79 0 top
NOREF#889  -  []  197.18 176.17 90 top
NOREF#890  -  []  130.58 263.21 90 top
NOREF#891  -  []  255.11 261.22 90 top
NOREF#892  -  []  194.07 251.6 90 top
NOREF#893  -  []  188.19 247.71 0 top
NOREF#894  -  []  276.8 280.49 90 top
NOREF#895  -  []  141.6 234.15 0 top
NOREF#896  -  []  179.08 201.22 0 top
NOREF#897  -  []  241.75 202.32 0 top
NOREF#898  -  []  140.95 264.09 90 top
NOREF#899  -  []  196.57 193.35 0 top
NOREF#900  -  []  268.78 244.35 0 top
NOREF#901  -  []  231.24 197.85 90 top
NOREF#902  -  []  228.19 187.71 0 top
NOREF#903  -  []  290.89 209.17 0 top
NOREF#904  -  []  269.72 221.62 0 top
NOREF#905  -  []  202.2 238.35 0 top
NOREF#906  -  []  197.71 173.69 90 top
NOREF#907  -  []  273.27 253.35 0 top
NOREF#908  -  []  171.25 244.35 0 top
NOREF#909  -  []  271.76 227.33 0 top
NOREF#910  -  []  203.84 260.97 90 top
NOREF#911  -  []  197.37 251.6 90 top
NOREF#912  -  []  221.85 232.5 0 top
NOREF#913  -  []  192.13 214.25 0 top
NOREF#914  -  []  244.61 234.89 90 top
NOREF#915  -  []  199.27 200.97 90 top
NOREF#916  -  []  240.13 456.29 0 top
NOREF#917  -  []  219.08 268.59 0 top
NOREF#918  -  []  191.19 223.92 0 top
NOREF#919  -  []  139.55 234.49 0 top
NOREF#920  -  []  194.78 176.5 90 top
NOREF#921  -  []  142.88 273.02 0 top
NOREF#922  -  []  134.51 263.76 0 top
NOREF#923  -  []  164.64 241.15 90 top
NOREF#924  -  []  312.52 456.29 90 top
NOREF#925  -  []  150.6 173.69 0 top
NOREF#926  -  []  215.11 261.22 90 top
NOREF#927  -  []  243.97 270.55 90 top
NOREF#928  -  []  162.88 458.49 0 top
NOREF#929  -  []  231.98 220.75 90 top
NOREF#930  -  []  147.3 220.35 0 top
NOREF#931  -  []  95.35 456.29 0 top
NOREF#932  -  []  157.37 180.3 90 top
NOREF#933  -  []  135.84 202.57 90 top
NOREF#934  -  []  228.32 185.63 0 top
NOREF#935  -  []  119.46 18.69 90 top
NOREF#936  -  []  263.49 193.03 90 top
NOREF#937  -  []  218.97 211.91 90 top
NOREF#938  -  []  284.95 212.86 90 top
NOREF#939  -  []  276.57 198.18 0 top
NOREF#940  -  []  235.17 216.75 90 top
NOREF#941  -  []  134.51 203.76 0 top
NOREF#942  -  []  266.96 251.6 90 top
NOREF#943  -  []  272.25 218.02 0 top
NOREF#944  -  []  148.44 197.85 90 top
NOREF#945  -  []  187.43 218.27 90 top
NOREF#946  -  []  188.32 198.18 0 top
NOREF#947  -  []  203.84 204.78 90 top
NOREF#948  -  []  266.83 251.93 0 top
NOREF#949  -  []  264.26 396.29 0 top
NOREF#950  -  []  168.54 208.95 0 top
NOREF#951  -  []  152.25 218.02 90 top
NOREF#952  -  []  223.49 247.06 90 top
NOREF#953  -  []  147.05 209.24 0 top
NOREF#954  -  []  159.27 261.77 0 top
NOREF#955  -  []  214.07 210.89 90 top
NOREF#956  -  []  173.24 201.55 0 top
NOREF#957  -  []  229.72 275.77 0 top
NOREF#958  -  []  132.64 204.47 0 top
NOREF#959  -  []  192.25 222.59 90 top
NOREF#960  -  []  228.19 247.71 0 top
NOREF#961  -  []  223.49 193.03 90 top
NOREF#962  -  []  235.17 212.18 90 top
NOREF#963  -  []  218.95 264.09 0 top
NOREF#964  -  []  276.7 241.72 90 top
NOREF#965  -  []  279.22 239.57 90 top
NOREF#966  -  []  236.61 233.37 90 top
NOREF#967  -  []  263.36 258.18 0 top
NOREF#968  -  []  214.07 270.89 90 top
NOREF#969  -  []  277.92 190.01 0 top
NOREF#970  -  []  199.22 250.88 90 top
NOREF#971  -  []  283.84 271.67 0 top
NOREF#972  -  []  252.64 264.47 0 top
NOREF#973  -  []  237.5 185.31 90 top
NOREF#974  -  []  156.33 227.9 90 top
NOREF#975  -  []  202.2 178.35 0 top
NOREF#976  -  []  211.05 232.28 90 top
NOREF#977  -  []  148.32 245.63 90 top
NOREF#978  -  []  229.84 284.11 90 top
NOREF#979  -  []  147.77 236.37 0 top
NOREF#980  -  []  271.73 232.54 0 top
NOREF#981  -  []  186.16 258.18 0 top
NOREF#982  -  []  173.64 299.09 0 top
NOREF#983  -  []  185.61 257.6 0 top
NOREF#984  -  []  143.61 456.29 90 top
NOREF#985  -  []  156.61 233.37 90 top
NOREF#986  -  []  288.42 268.62 0 top
NOREF#987  -  []  191.91 251.6 90 top
NOREF#988  -  []  136.38 204.09 90 top
NOREF#989  -  []  149.84 219.54 0 top
NOREF#990  -  []  88.16 144.87 0 top
NOREF#991  -  []  178.97 18.69 90 top
NOREF#992  -  []  260.95 206.12 90 top
NOREF#993  -  []  214.51 263.76 0 top
NOREF#994  -  []  196.57 258.18 0 top
NOREF#995  -  []  276.33 227.9 90 top
NOREF#996  -  []  168.54 200.64 90 top
NOREF#997  -  []  266.16 200.17 90 top
NOREF#998  -  []  186.43 222.5 90 top
NOREF#999  -  []  234.39 222.02 90 top
NOREF#1000  -  []  246.32 212.22 0 top
NOREF#1001  -  []  284.95 270.32 90 top
NOREF#1002  -  []  149.24 245.31 90 top
NOREF#1003  -  []  235.05 214.25 0 top
NOREF#1004  -  []  273.83 232.21 90 top
NOREF#1005  -  []  181.22 76.69 90 top
NOREF#1006  -  []  211.21 234.24 90 top
NOREF#1007  -  []  233.94 196.75 0 top
NOREF#1008  -  []  201.84 235.2 0 top
NOREF#1009  -  []  136.63 232.23 0 top
NOREF#1010  -  []  197.04 184.35 0 top
NOREF#1011  -  []  148.44 241.72 90 top
NOREF#1012  -  []  271.98 286.59 90 top
NOREF#1013  -  []  138.85 181.15 90 top
NOREF#1014  -  []  159.4 272 0 top
NOREF#1015  -  []  196.7 253.03 90 top
NOREF#1016  -  []  225.09 257.49 90 top
NOREF#1017  -  []  180.83 263.76 90 top
NOREF#1018  -  []  139.08 265.79 0 top
NOREF#1019  -  []  284.95 272.86 90 top
NOREF#1020  -  []  144.04 251.93 0 top
NOREF#1021  -  []  175.24 201.55 90 top
NOREF#1022  -  []  130.92 231.95 90 top
NOREF#1023  -  []  246.32 272.22 0 top
NOREF#1024  -  []  289.52 207.27 90 top
NOREF#1025  -  []  145.61 197.6 0 top
NOREF#1026  -  []  235.17 221.32 90 top
NOREF#1027  -  []  208.42 265.58 0 top
NOREF#1028  -  []  237.18 176.17 90 top
NOREF#1029  -  []  152.13 224.66 0 top
NOREF#1030  -  []  106.68 128.02 0 top
NOREF#1031  -  []  140.83 201.22 90 top
NOREF#1032  -  []  155.49 228.7 90 top
NOREF#1033  -  []  230.88 168.6 90 top
NOREF#1034  -  []  193.98 178.07 0 top
NOREF#1035  -  []  178.95 264.09 0 top
NOREF#1036  -  []  174.43 232.23 0 top
NOREF#1037  -  []  269.72 281.62 0 top
NOREF#1038  -  []  263.36 187.38 0 top
NOREF#1039  -  []  228.32 245.63 0 top
NOREF#1040  -  []  169.52 204.23 90 top
NOREF#1041  -  []  276.1 216.42 90 top
NOREF#1042  -  []  233.94 191.93 0 top
NOREF#1043  -  []  220.83 265.79 90 top
NOREF#1044  -  []  209.55 237.49 90 top
NOREF#1045  -  []  264.04 196.75 0 top
NOREF#1046  -  []  173.64 239.09 0 top
NOREF#1047  -  []  226.43 282.49 90 top
NOREF#1048  -  []  238.91 232.21 90 top
NOREF#1049  -  []  201.75 212.22 0 top
NOREF#1050  -  []  209.49 280.89 0 top
NOREF#1051  -  []  218.83 232.23 0 top
NOREF#1052  -  []  269.84 284.11 0 top
NOREF#1053  -  []  268.44 181.72 90 top
NOREF#1054  -  []  146.83 256.75 0 top
NOREF#1055  -  []  188.81 250.88 90 top
NOREF#1056  -  []  133.64 239.09 0 top
NOREF#1057  -  []  163.97 270.55 90 top
NOREF#1058  -  []  208.54 265.9 0 top
NOREF#1059  -  []  247.98 286.38 90 top
NOREF#1060  -  []  249.52 212.86 90 top
NOREF#1061  -  []  137.28 286.47 90 top
NOREF#1062  -  []  188.99 180.62 0 top
NOREF#1063  -  []  256.38 204.09 90 top
NOREF#1064  -  []  88.14 130.81 90 top
NOREF#1065  -  []  209.52 204.23 90 top
NOREF#1066  -  []  196.45 247.71 0 top
NOREF#1067  -  []  278.13 389.27 90 top
NOREF#1068  -  []  213.65 179.15 0 top
NOREF#1069  -  []  224.04 196.75 0 top
NOREF#1070  -  []  159.4 213.09 90 top
NOREF#1071  -  []  237.71 233.69 90 top
NOREF#1072  -  []  131.05 229.49 0 top
NOREF#1073  -  []  264.16 256.43 90 top
NOREF#1074  -  []  232.25 272.17 90 top
NOREF#1075  -  []  272.25 218.02 90 top
NOREF#1076  -  []  227.77 197.6 0 top
NOREF#1077  -  []  148.32 242.05 0 top
NOREF#1078  -  []  151.91 251.6 90 top
NOREF#1079  -  []  134.43 232.23 0 top
NOREF#1080  -  []  203.84 267.82 90 top
NOREF#1081  -  []  259.08 268.59 0 top
NOREF#1082  -  []  239.27 261.77 0 top
NOREF#1083  -  []  154.33 207.37 90 top
NOREF#1084  -  []  259.73 238.35 0 top
NOREF#1085  -  []  221.85 292.49 0 top
NOREF#1086  -  []  147.8 269.99 0 top
NOREF#1087  -  []  235.92 190.88 90 top
NOREF#1088  -  []  243.84 261.77 0 top
NOREF#1089  -  []  190.56 197.6 0 top
NOREF#1090  -  []  249.52 260.42 90 top
NOREF#1091  -  []  166.32 274.76 0 top
NOREF#1092  -  []  236.57 185.63 90 top
NOREF#1093  -  []  279.22 195.7 90 top
NOREF#1094  -  []  148.81 190.88 90 top
NOREF#1095  -  []  242.2 238.35 0 top
NOREF#1096  -  []  261.55 267.14 90 top
NOREF#1097  -  []  178.35 211.84 0 top
NOREF#1098  -  []  196.8 225.06 90 top
NOREF#1099  -  []  173.34 17.15 90 top
NOREF#1100  -  []  124.55 148.49 90 top
NOREF#1101  -  []  204.95 267.27 90 top
NOREF#1102  -  []  233.18 184.35 0 top
NOREF#1103  -  []  162.26 176.17 90 top
NOREF#1104  -  []  168.42 204.78 90 top
NOREF#1105  -  []  271.24 197.85 90 top
